# Altium PCB ServoPCB.PcbDoc
Units mil, origin at the board's own origin, x right, y up, seen from the top; angles counter-clockwise.
Board outline 2000 x 2000 mil, 4 copper layers (Top Layer, 3V3 Layer, GND Layer, Bottom Layer), stack 23.756 mil thick; 54 components, 30 nets, 194 pads, 73 vias.
Unrouted connection lines stored in the file: 1.
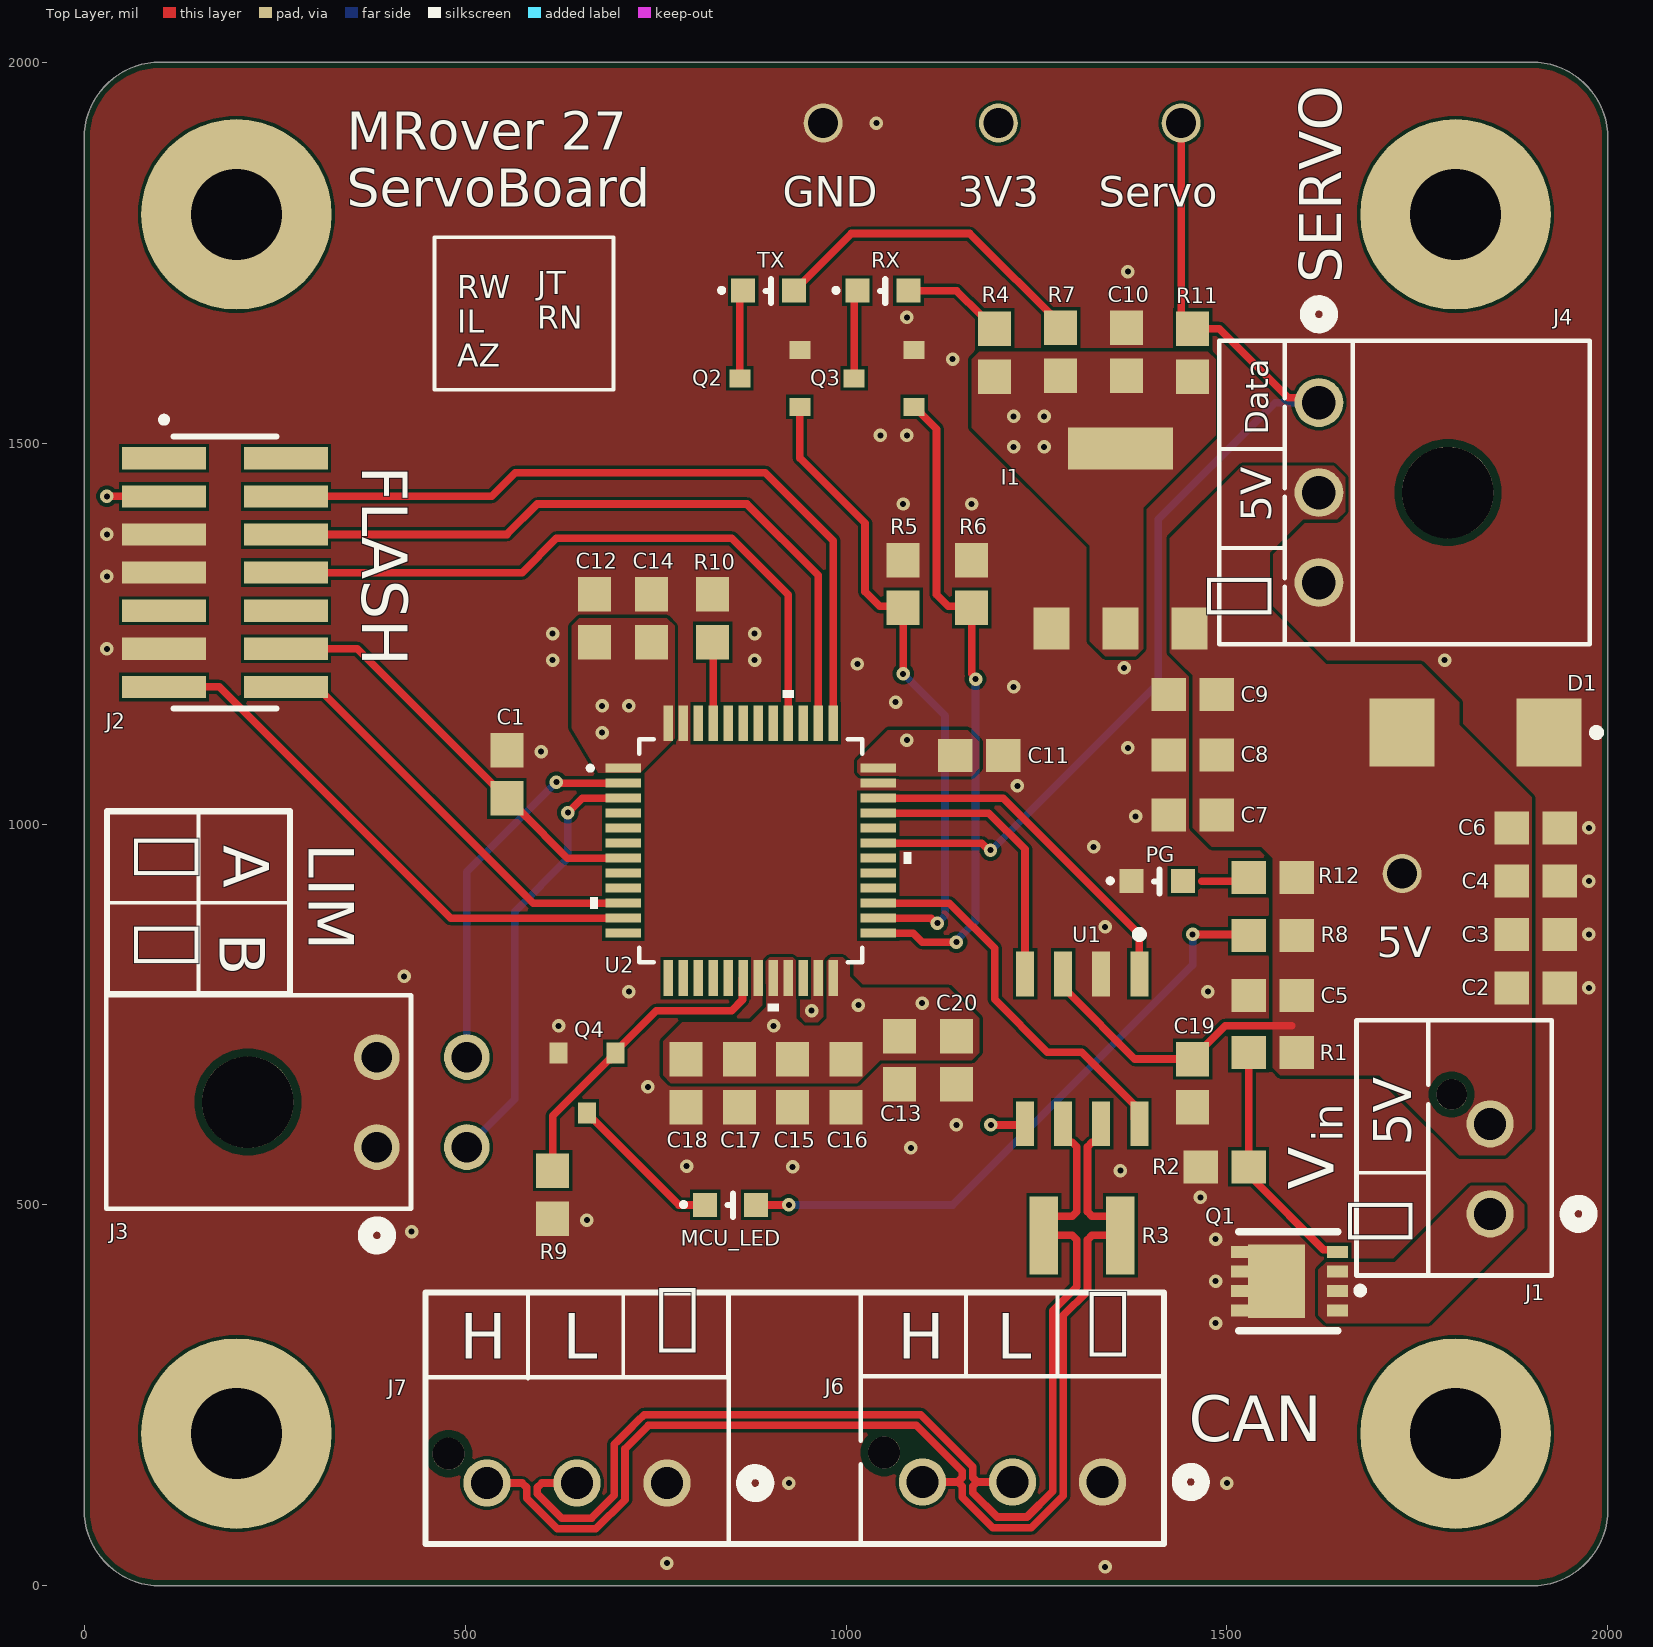
[diagram p0: Top Layer view]
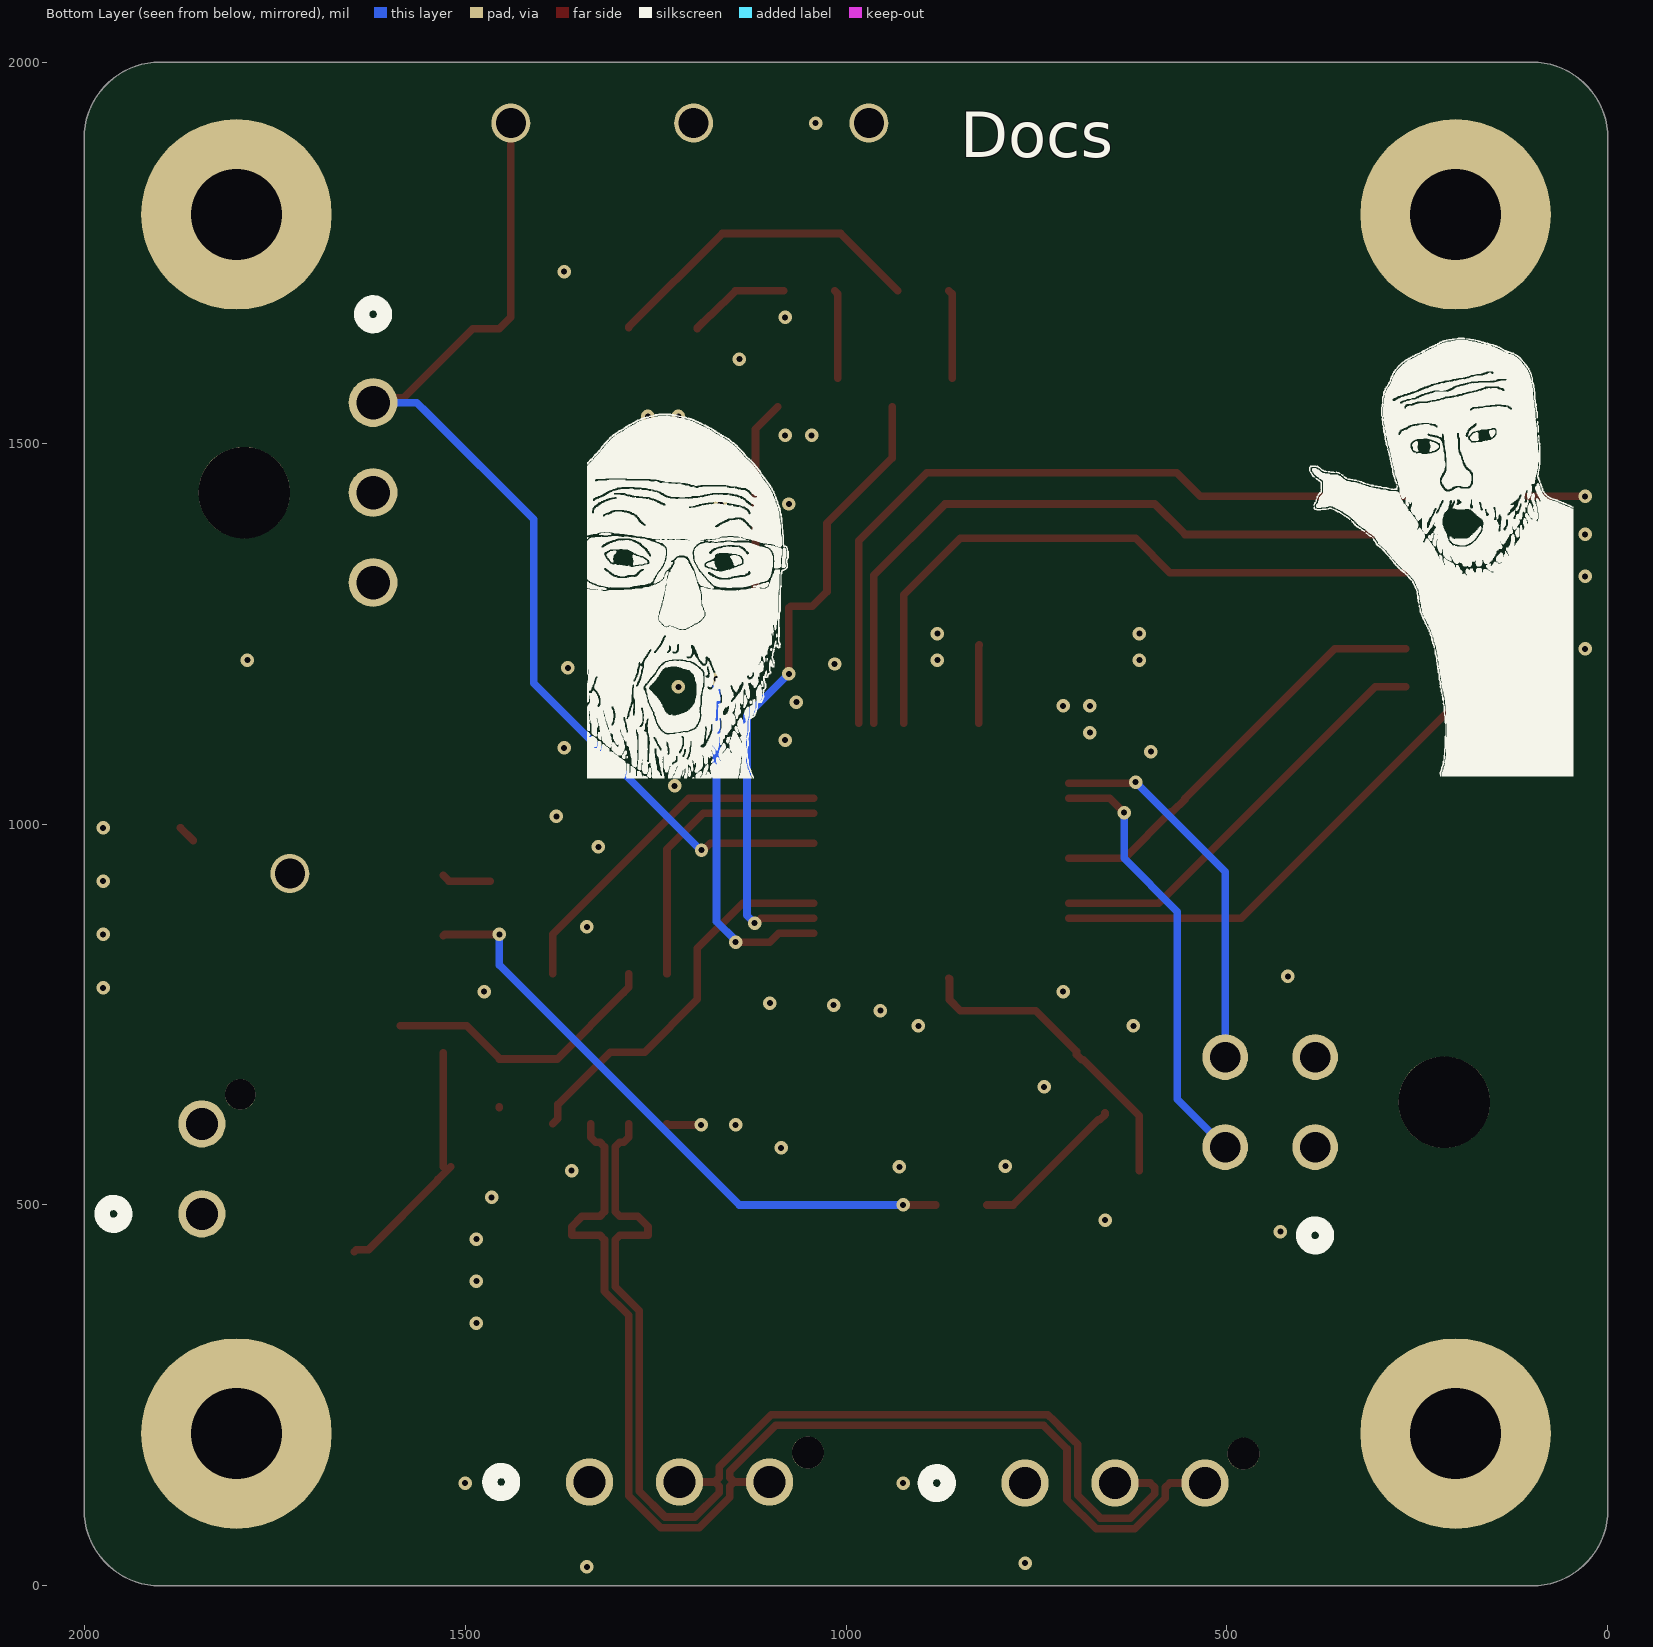
[diagram p1: Bottom Layer view, seen from below]
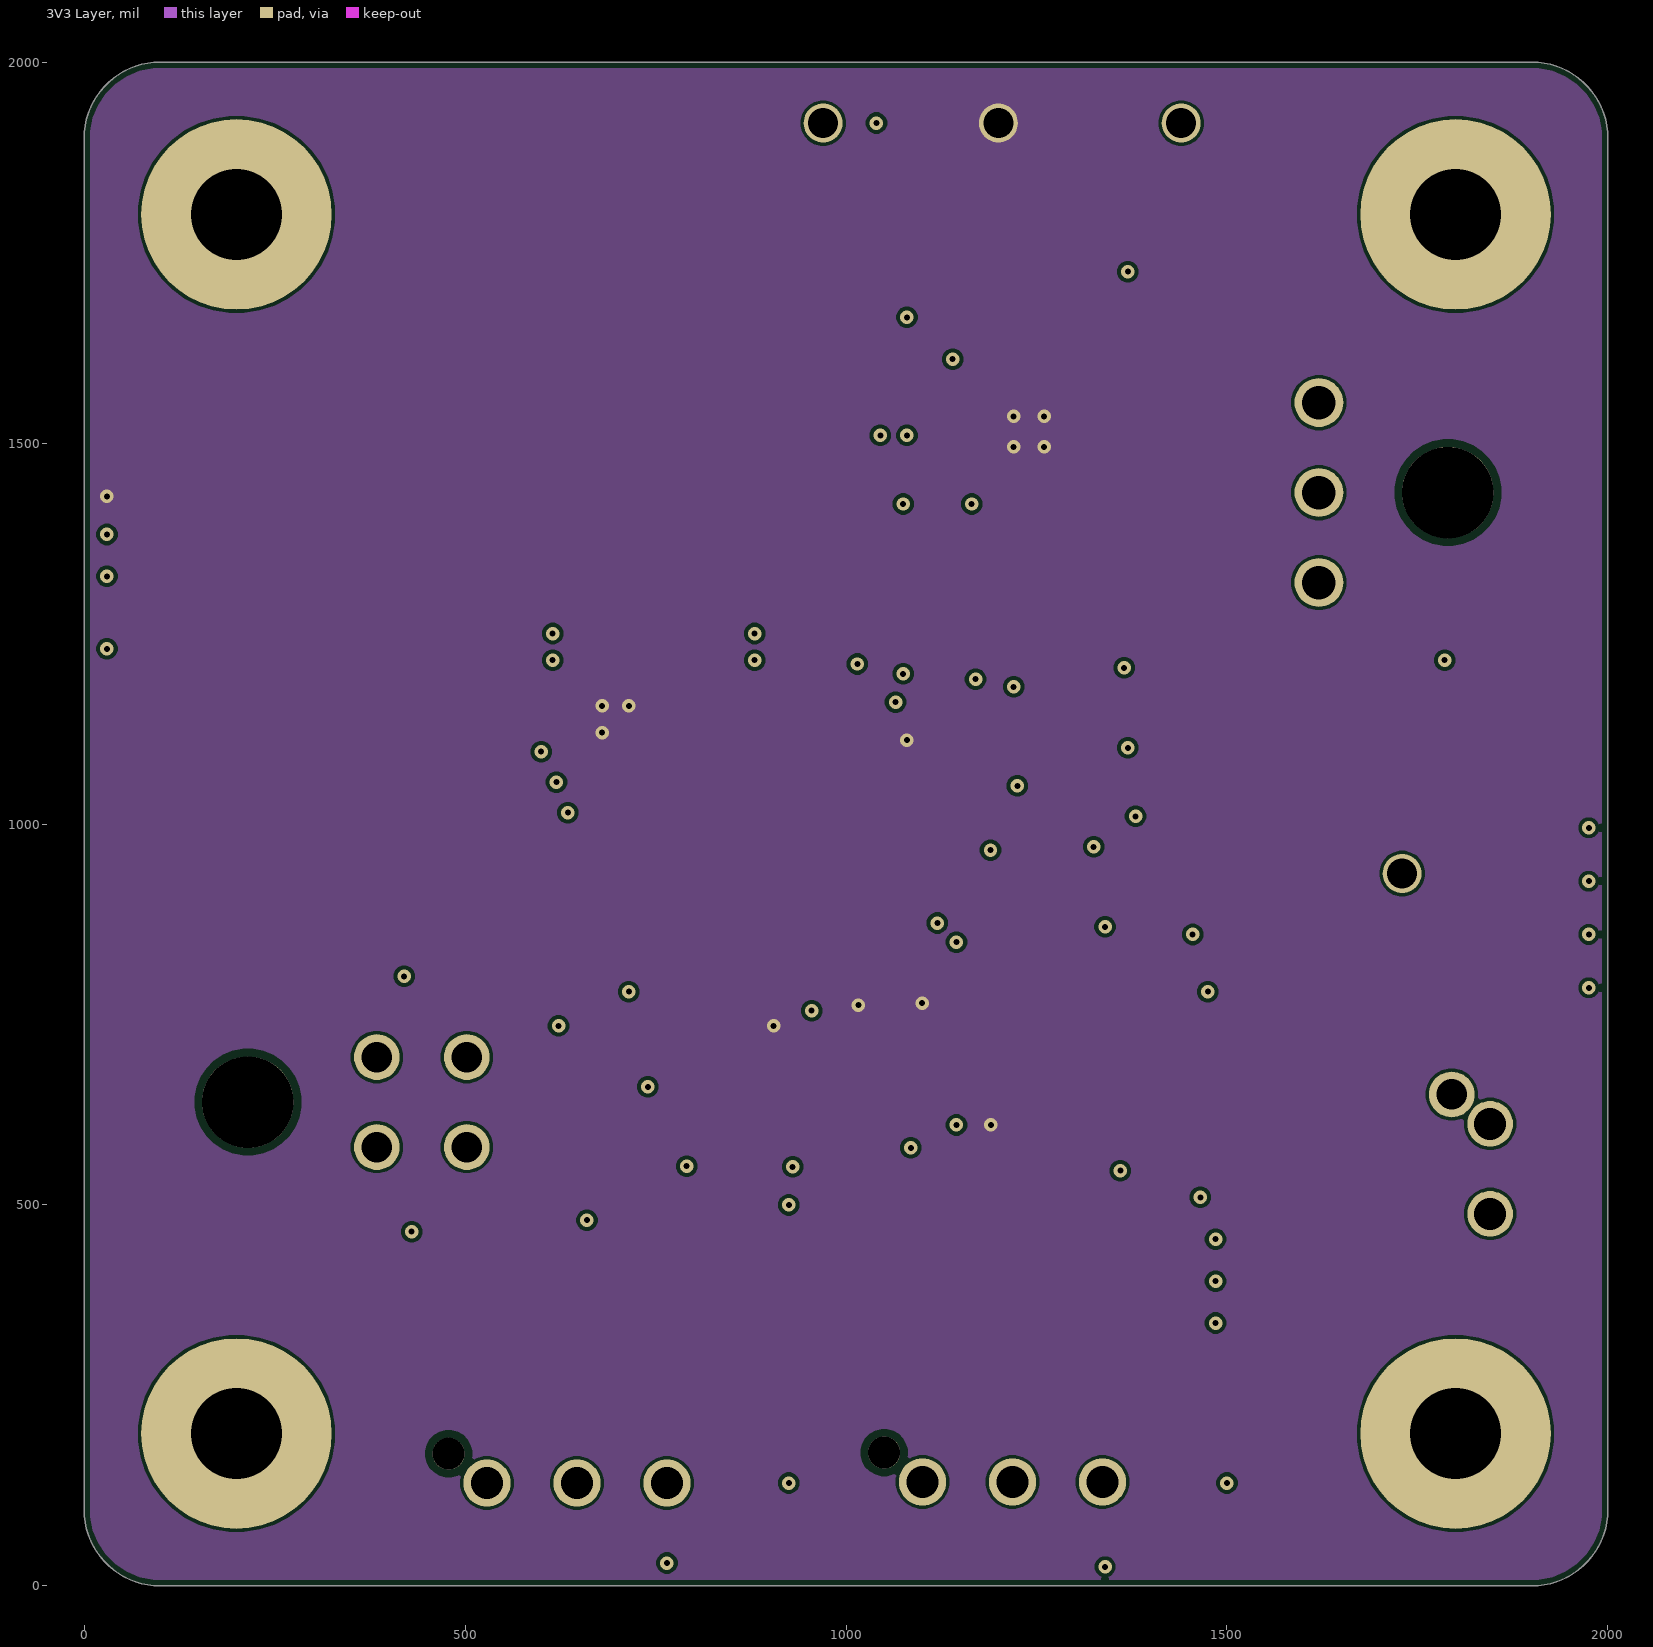
[diagram p2: 3V3 Layer]
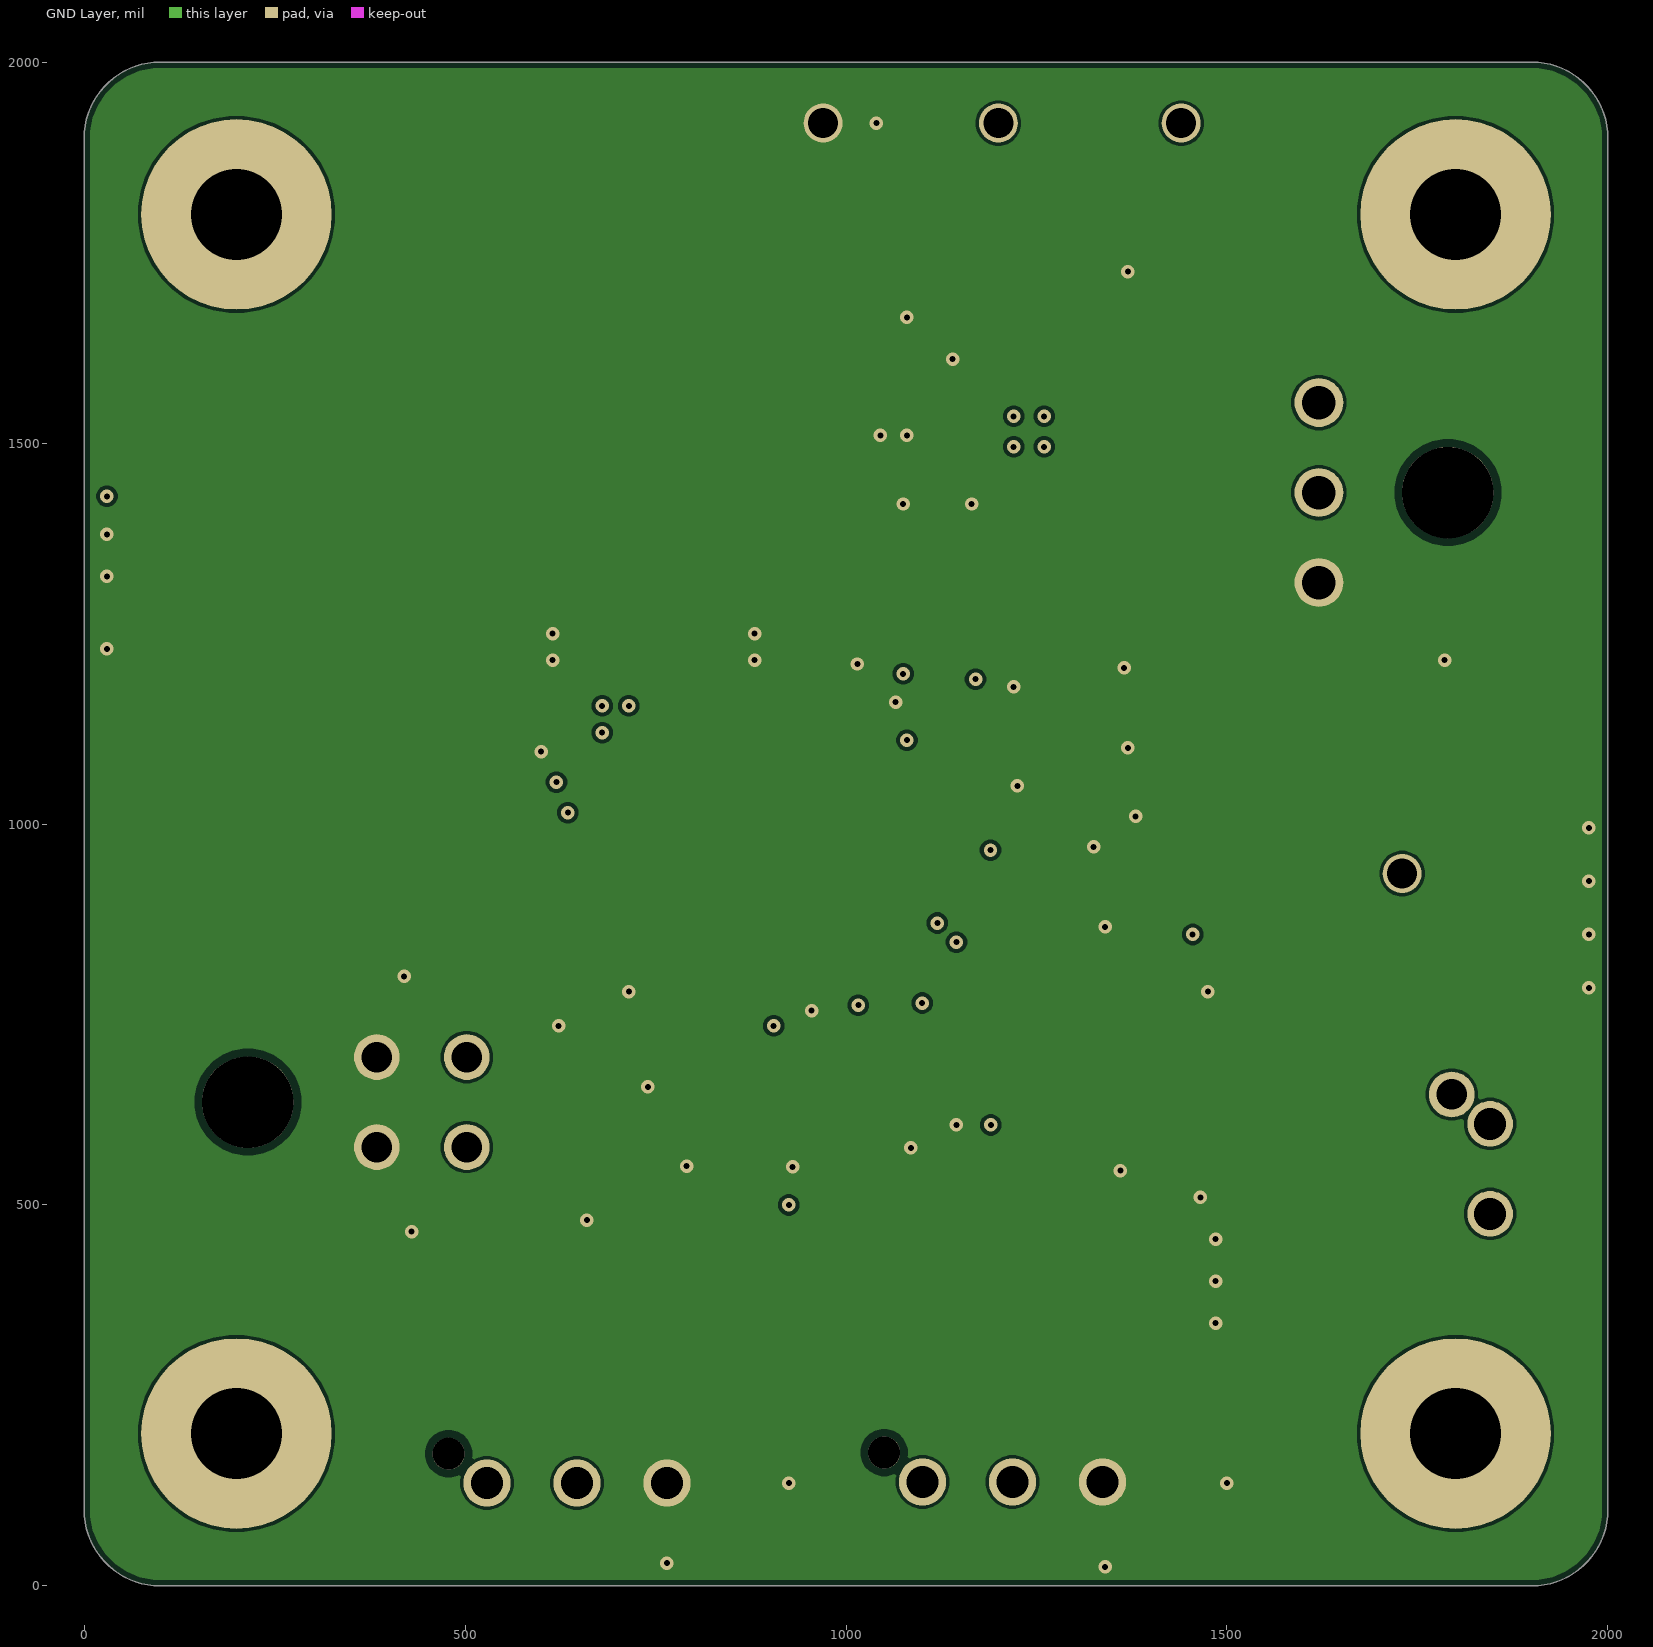
[diagram p3: GND Layer]
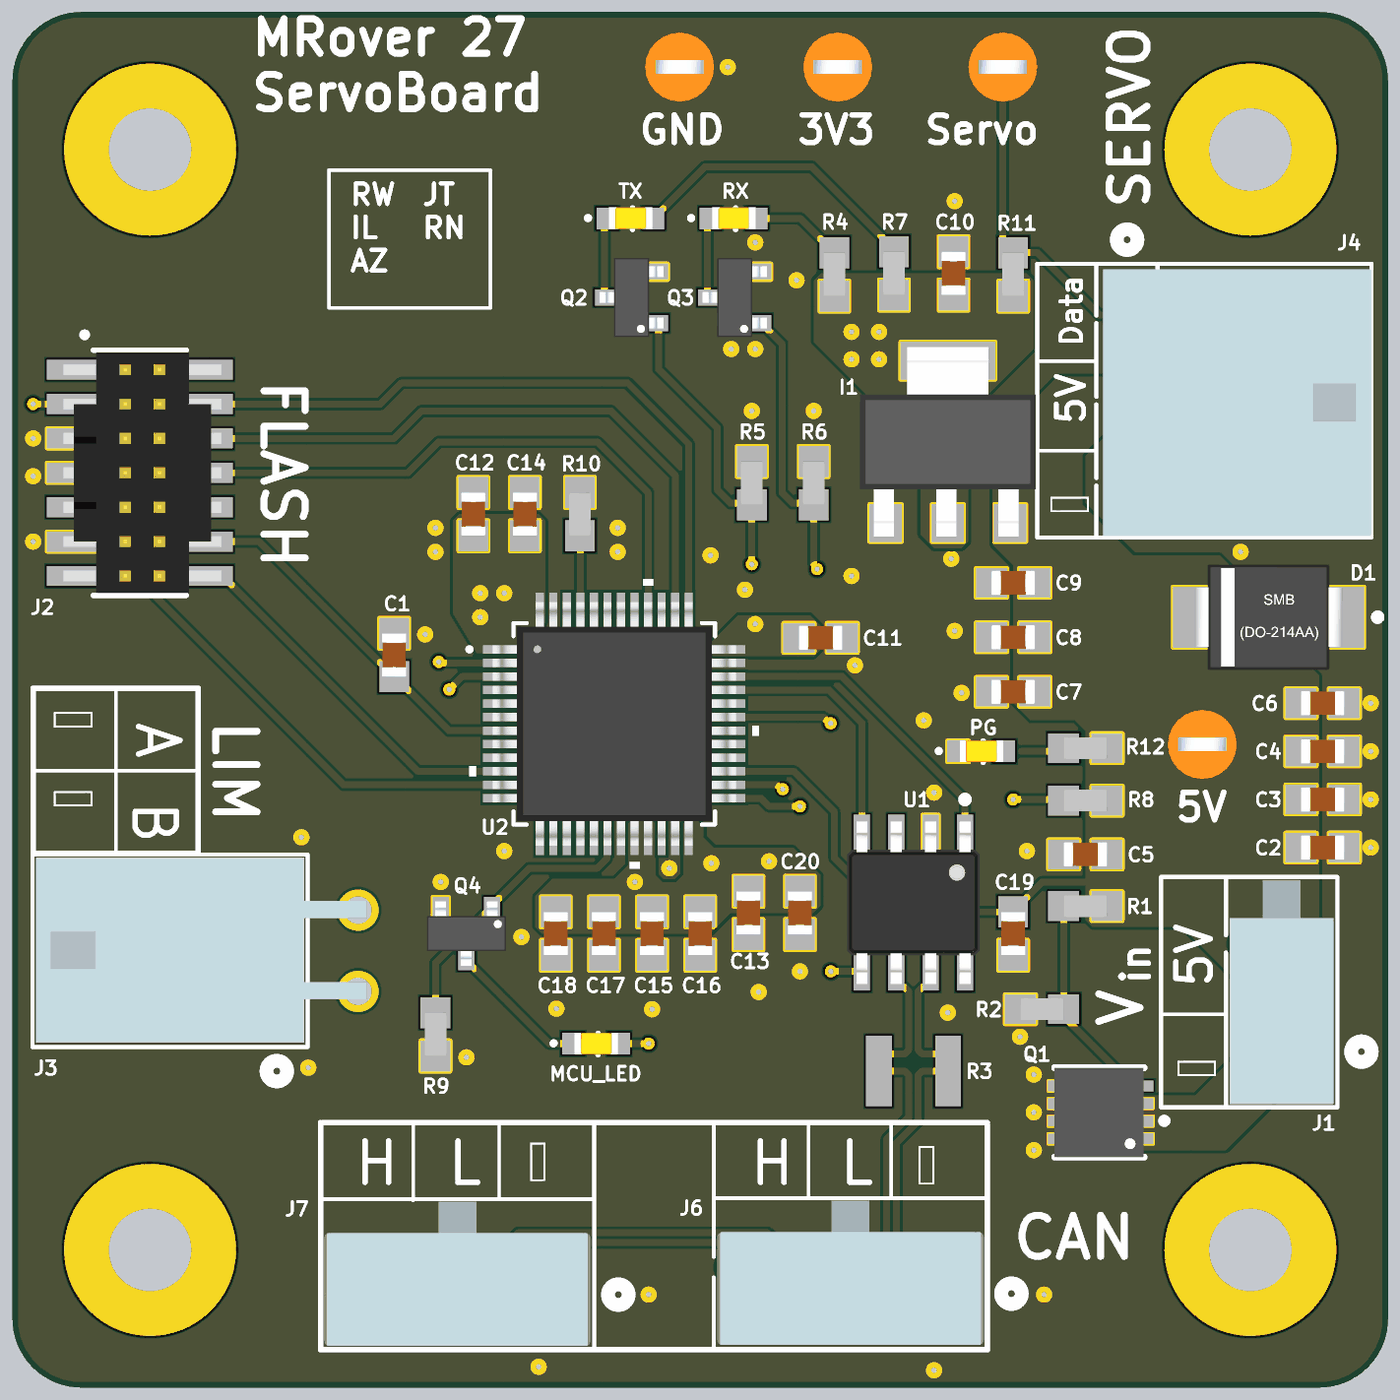
[diagram p4: 3D render of the assembled board from above, using the file's embedded part models]

## Layer stack, top to bottom
Top Solder: solder mask 0.4, Solder Resist, Dk 3.5
Top Layer: signal copper 1.4
Dielectric 1: prepreg 2.8, PP-006, Dk 4.1
3V3 Layer: signal copper 1.378
Dielectric 2: dielectric 12.6, FR-4, Dk 4.8
GND Layer: signal copper 1.378
Dielectric 3: prepreg 2.8, PP-006, Dk 4.1
Bottom Layer: signal copper 1.4
Bottom Solder: solder mask 0.4, Solder Resist, Dk 3.5

## Board outline
0,100 0,1900 cw(c100,1900) 100,2000 1900,2000 cw(c1900,1900) 2000,1900 2000,100 cw(c1900,100) 1900,0 100,0 cw(c100,100)

## Design rules (kind name [scope] priority, off if disabled: settings)
BoardOutlineClearance [All] p1: gap=7.87 ignorepadtopadclearanceinfootprint=FALSE
Clearance "Stitching GND" [IsStitchingVia and InNet('GND') vs (IsVia and (Not IsStitchingVia)) Or IsPad] p1: gap=5 ignorepadtopadclearanceinfootprint=FALSE
Clearance [All] p2: gap=4 ignorepadtopadclearanceinfootprint=FALSE except(2: Arc-THPad Track-THPad THPad-THPad; 5: Arc-Via Track-Via SMDPad-Via THPad-Via Via-Via Via-Fill Via-Poly Via-Region Via-Text; 9.84: Arc-Hole Track-Hole SMDPad-Hole THPad-Hole Via-Hole Fill-Hole Poly-Hole Region-Hole Text-Hole)
ComponentClearance [All] p1: gap=4 collisioncheckmode=3 verticalgap=4 showdistances=TRUE
DiffPairsRouting [All] p1: maxlimit=4 minlimit=4 mostfreqgap=4 toplayer_minwidth=4 toplayer_maxwidth=71497.94 toplayer_prefwidth=4 midlayer1_minwidth=4 midlayer1_maxwidth=71497.94 midlayer1_prefwidth=4 midlayer2_minwidth=4 midlayer2_maxwidth=71497.94 midlayer2_prefwidth=4 bottomlayer_minwidth=4 bottomlayer_maxwidth=71497.94 bottomlayer_prefwidth=4 maxuncoupledlength=500
Height [All] p1: minheight=0 maxheight=71497.94 prefheight=500
HoleSize [All] p1: absolutevalues=TRUE maxlimit=248.03 minlimit=7.87 maxpercent=80.000 minpercent=20.000
HoleToHoleClearance [All] p1: gap=9.84 allowstackedmicrovias=FALSE
MinimumAnnularRing [All] p1: minimumring=3
MinimumSolderMaskSliver [All] p1: minsoldermaskwidth=0
PlaneClearance [All] p1: clearance=4
PlaneConnect PlaneConnectPowerPads [InPadClass('PowerPads')] p1: planeconnectstyle=Direct reliefexpansion=20 reliefentries=4 reliefconductorwidth=10 reliefairgap=10
PlaneConnect [All] p2: pad.planeconnectstyle=Relief pad.reliefexpansion=11.81 pad.reliefentries=4 pad.reliefconductorwidth=4 pad.reliefairgap=4 via.planeconnectstyle=Direct via.reliefexpansion=11.81 via.reliefentries=4 via.reliefconductorwidth=5 via.reliefairgap=5
PolygonConnect PolygonConnect_GND [All] p1: connectstyle=Direct reliefconductorwidth=10 reliefentries=4 polygonreliefangle="90 Angle" airgapwidth=10
PolygonConnect PolygonConnect_3v3 [InNet('VBAT') vs InNet('VBAT')] p2: connectstyle=Direct reliefconductorwidth=10 reliefentries=4 polygonreliefangle="90 Angle" airgapwidth=10
PolygonConnect PolygonConnect_source [InNet('NetJ1_2') vs InNet('NetJ1_2')] p3: connectstyle=Direct reliefconductorwidth=10 reliefentries=4 polygonreliefangle="90 Angle" airgapwidth=10
PolygonConnect PolygonConnect_5V [InNet('+5V') vs InNet('+5V')] p4: connectstyle=Direct reliefconductorwidth=10 reliefentries=4 polygonreliefangle="90 Angle" airgapwidth=10
PolygonConnect PolygonConnectPowerPads [All vs (InPadClass('PowerPads'))] p5: connectstyle=Direct reliefconductorwidth=10 reliefentries=4 polygonreliefangle="90 Angle" airgapwidth=10
PolygonConnect [All] p6: thpad.connectstyle=Relief thpad.reliefconductorwidth=4 thpad.reliefentries=4 thpad.polygonreliefangle="90 Angle" thpad.airgapwidth=4 smdpad.connectstyle=Relief smdpad.reliefconductorwidth=4 smdpad.reliefentries=4 smdpad.polygonreliefangle="90 Angle" smdpad.airgapwidth=4 via.connectstyle=Direct via.reliefconductorwidth=5 via.reliefentries=4 via.polygonreliefangle="90 Angle" via.airgapwidth=5
RoutingVias [All] p1: holewidth=7.87 width=17.72 viastyle="Through Hole" minholewidth=7.87 minwidth=17.72 maxholewidth=248.03 maxwidth=257.87
SilkToSilkClearance [All] p1: silktosilkclearance=0
SilkToSolderMaskClearance [IsPad] p1: minsilkscreentomaskgap=4 clearancetoexposedcopper=TRUE
SolderMaskExpansion [All] p1: expansion=2.95 istentingtop=FALSE
SupplyNets "Schematic Supply Nets_2" [InNet('+5V')] p1: voltage=0.000
SupplyNets "Schematic Supply Nets_1" [InNet('GND')] p2: voltage=0.000
SupplyNets "Schematic Supply Nets" [InNet('VBAT')] p3: voltage=0.000
Width [All] p1: maxlimit=71497.94 minlimit=4 preferedwidth=10 minimp=50.000000 maximp=50.000000 favimp=50.000000
20 further rules are at their usual default settings.

## Classes and differential pairs
component class MCU: C1 C11 C12 C13 C14 C15 C16 C17 C18 J2 MCU_LED PG Q4 R8 R9 R10 R12 U2
component class "Input Power": 3V3 5V C2 C3 C4 C5 C6 C7 C8 C9 C10 D1 GND I1 J1 Q1 R1 R2
component class Headers: J3 J4 J6 J7 R11 Servo Servo_DATA
component class CAN: C19 C20 Q2 Q3 R3 R4 R5 R6 R7 RX TX U1
differential pair CAN: +CAN_H -CAN_L

## Components (designator, comment, footprint, x,y, rotation, side; value= is the part's Value field where it differs from the comment)
3V3 "5003" TEST-POINT-0001 1200,1920 r0 top
5V "5003" TEST-POINT-0001 1730,935 r0 top
C1 "0603B104J500XD" CAP-0603 555,1065 r270 top
C2 "0603W106M250XD" CAP-0603 1905,785 r0 top
C3 "0603B105K500XD" CAP-0603 1905,855 r0 top
C4 "0603B104J500XD" CAP-0603 1905,925 r0 top
C5 "0603B103K101SD" CAP-0603 1560,775 r180 top
C6 "0603N102J500SD" CAP-0603 1905,995 r0 top
C7 "0603N101J101SD" CAP-0603 1455,1011.67 r180 top
C8 "0603N100F500SD" CAP-0603 1455,1090.83 r180 top
C9 "0603W106M250XD" CAP-0603 1455,1170 r180 top
C10 "0603W106M250XD" CAP-0603 1368.33,1620 r90 top
C11 "0603B104J500XD" CAP-0603 1175,1090 r0 top
C12 "0603B104J500XD" CAP-0603 670,1270 r90 top
C13 "0603B104J500XD" CAP-0603 1070,690 r270 top
C14 "0603W475K250XD" CAP-0603 745,1270 r90 top
C15 "0603B103K101SD" CAP-0603 930,660 r270 top
C16 "0603B105K500XD" CAP-0603 1000,660 r270 top
C17 "0603B104J500XD" CAP-0603 860,660 r270 top
C18 "0603B105K500XD" CAP-0603 790,660 r270 top
C19 "0603B105K500XD" CAP-0603 1455,660 r270 top
C20 "0603B105K500XD" CAP-0603 1145,690 r270 top
D1 "SMBJ40CA" "DO-214AA (SMBJ)" 1825,1120 r0 top
GND "5003" TEST-POINT-0001 970,1920 r0 top
I1 "LM1117IMPX-3.3/NOPB" IC-SOT-223-4 1360,1375 r90 top
J1 "2068320201" CONN_2068320000-SD_02_MOL 1845.39,488.31 r0 top
J2 "FTSH-107-01-L-DV-K" SAMTEC_FTSH-107-01-L-DV-K 185,1330 r270 top
J3 "2125280400" CONN_2125280000_04_MOL 384.29,575.94 r270 top
J4 "2157601003" CONN_2157600003-SD_03_PEG_MOL 1620.71,1553.11 r90 top
J6 "2165712003" CONN_2165710003-SD_03_MOL 1336.61,136.42 r0 top
J7 "2165712003" CONN_2165710003-SD_03_MOL 765,135 r0 top
MCU_LED "BL-HKC36G-AV-TRB" LED-0603 791.8,470.42 r0 top
PG "BL-HKC36G-AV-TRB" LED-0603 1351.8,895.42 r0 top
Q1 "CSD18543Q3AT" IC-8VSONCLIP 1679.84,327.68 r90 top
Q2 "T2N7002AK,LM" IC-SOT23-3 900,1585 r90 top
Q3 "T2N7002AK,LM" IC-SOT23-3 1050,1585 r90 top
Q4 "T2N7002AK,LM" IC-SOT23-3 660,660 r180 top
R1 "RMCF0603FT150R" RES-0603 1560,700 r180 top
R2 "RMCF0603FT150R" RES-0603 1497.01,550 r180 top
R3 "RC1210FR-07120RL" RES-1210 1310,460 r180 top
R4 "RMCF0603FT150R" RES-0603 1195,1618.5 r90 top
R5 "CR0603-FX-1002ELF" RES-0603 1075,1315 r270 top
R6 "CR0603-FX-1002ELF" RES-0603 1165,1315 r270 top
R7 "CR0603-FX-68R0ELF" RES-0603 1281.67,1620 r90 top
R8 "CR0603-FX-2000ELF" RES-0603 1560,853.33 r180 top
R9 "CR0603-FX-1002ELF" RES-0603 615,513.5 r270 top
R10 "RC0603JR-070RL" RES-0603 825,1270 r270 top
R11 "CR0603-FX-1002ELF" RES-0603 1455,1618.5 r270 top
R12 "CR0603-FX-2000ELF" RES-0603 1560,929.61 r180 top
RX "BL-HKC36G-AV-TRB" LED-0603 991.8,1670.43 r0 top
Servo "5003" TEST-POINT-0001 1440,1920 r180 top (schematic designator TP4)
TX "BL-HKC36G-AV-TRB" LED-0603 841.8,1670.43 r0 top
U1 "TCAN1044VDRQ1" IC-8SOIC 1310,705 r180 top
U2 "STM32G431CBT6" IC-LQFP48 875,965 r0 top

## Footprints (in the part's own frame and the unit in brackets; to place one, negate y for a bottom-side part, rotate by r counter-clockwise, add the part's x,y. Pads: shape width x height; smd on the part's side, far side on the other; paste and mask are expansions set on the pad)
CAP-0603 [mm]
  rect 1.15x1.1 smd: 1(-0.8,0) 2(0.8,0)
  body extent -0.8,-0.45 0.8,0.45, height 0.8
CONN_2068320000-SD_02_MOL [mil]
  round 62 / inner round 60 / far side round 62 hole 42 paste-99999 mask+0: 1(0,0) 2(0,118.11)
  round 40 / inner round 60 / far side round 40 hole 40 unplated paste-99999 mask+0: 3(-50.39,156.69)
  silkscreen extent -81,-81 131,254, body extent -76,-76 76,249, height 392
CONN_2125280000_04_MOL [mil]
  round 60 hole 40 paste-99999 mask+0: 1(0,0) 2(-118.11,0) 3(0,118.11) 4(-118.11,118.11)
  round 120 hole 120 unplated paste-99999 mask+0: 5(-59.06,-169.29)
  silkscreen extent -199,-355 131,45, body extent -195,-350 75,131, height 325
CONN_2157600003-SD_03_PEG_MOL [mil]
  round 64 hole 44 paste-99999 mask+0: 1(0,0) 2(-118.11,0) 3(-236.22,0)
  round 120 hole 120 unplated paste-99999 mask+0: 4(-118.11,-169.29)
  silkscreen extent -317,-355 131,45, body extent -315,-355 73,35, height 210
CONN_2165710003-SD_03_MOL [mil]
  round 62 hole 42 paste-99999 mask+0: 1(0,0) 2(-118.11,0) 3(-236.22,0)
  round 42 hole 42 unplated paste-99999 mask+0: 4(-286.61,38.58)
  silkscreen extent -317,-81 131,139, body extent -312,-75 76,135, height 394
"DO-214AA (SMBJ)" [mm]
  rect 2.16x2.26 smd: 1(-2.416,0) 2(2.484,0)
  silkscreen extent 3.94,-0.12 4.19,0.12, body extent -2.72,-1.95 2.78,1.95, height 2.45
IC-8SOIC [mm]
  rect 0.6x1.5 smd: 1(-1.905,-2.5) 2(-0.635,-2.5) 3(0.635,-2.5) 4(1.905,-2.5) 5(1.905,2.5) 6(0.635,2.5) 7(-0.635,2.5) 8(-1.905,2.5)
  silkscreen extent -2.03,-3.93 -1.78,-3.69, body extent -2.45,-3 2.45,3, height 1.75
IC-8VSONCLIP [mm]
  rect 0.4x0.7 smd paste-100 mask+0.05: 1(2.812,0.877) 2(0.862,0.877) 2(1.512,0.877) 2(2.162,0.877) 3(0.862,4.077) 3(1.512,4.077) 3(2.162,4.077) 3(2.812,4.077)
  rect 2.45x1.9 smd paste-100 mask+0.05: 3(1.837,2.917)
  silkscreen extent 0.19,0.03 3.49,4.18, body extent 0.18,0.89 3.48,4.19, height 1.1
IC-LQFP48 [mil]
  rect 47x12 smd paste+0 mask+0: 1(-167.32,108.27) 2(-167.32,88.58) 3(-167.32,68.9) 4(-167.32,49.21) 5(-167.32,29.53) 6(-167.32,9.84) 7(-167.32,-9.84) 8(-167.32,-29.53) 9(-167.32,-49.21) 10(-167.32,-68.9) 11(-167.32,-88.58) 12(-167.32,-108.27) 25(167.32,-108.27) 26(167.32,-88.58) 27(167.32,-68.9) 28(167.32,-49.21) 29(167.32,-29.53) 30(167.32,-9.84) 31(167.32,9.84) 32(167.32,29.53) 33(167.32,49.21) 34(167.32,68.9) 35(167.32,88.58) 36(167.32,108.27)
  rect 12x47 smd paste+0 mask+0: 13(-108.27,-167.32) 14(-88.58,-167.32) 15(-68.9,-167.32) 16(-49.21,-167.32) 17(-29.53,-167.32) 18(-9.84,-167.32) 19(9.84,-167.32) 20(29.53,-167.32) 21(49.21,-167.32) 22(68.9,-167.32) 23(88.58,-167.32) 24(108.27,-167.32) 37(108.27,167.32) 38(88.58,167.32) 39(68.9,167.32) 40(49.21,167.32) 41(29.53,167.32) 42(9.84,167.32) 43(-9.84,167.32) 44(-29.53,167.32) 45(-49.21,167.32) 46(-68.9,167.32) 47(-88.58,167.32) 48(-108.27,167.32)
  silkscreen extent -214,-211 211,211, body extent -177,-177 177,177, height 63
IC-SOT23-3 [mm]
  rect 0.6x0.7 smd: 1(-0.95,-1) 2(0.95,-1) 3(0,1)
  body extent -1.46,-1.18 1.46,1.19, height 1.12
IC-SOT-223-4 [mm]
  rect 1.4x1.2 smd mask+0.07: 1(-3,2.3) 3(-3,-2.3) 4(-3,0)
  rect 1.4x3.5 smd: 2(3,0)
  body extent -3.5,-3.25 3.5,3.25, height 1.68
LED-0603 [mm]
  rect 0.8x0.8 smd: 1(2.291,0.751) 2(0.589,0.751)
  silkscreen extent -0.2,0.34 1.52,1.13, body extent 0.65,0.36 2.25,1.16, height 0.39
RES-0603 [mm]
  rect 1.15x1.1 smd: 1(-0.8,0) 2(0.8,0)
  body extent -0.8,-0.4 0.8,0.4, height 0.43
RES-1210 [mm] "Chip Resistor, 2-Leads, Body 3.10x2.60mm, IPC High Density"
  rect 0.95x2.6 smd: 1(-1.275,0) 2(1.275,0)
  body extent -1.6,-1.35 1.6,1.35, height 0.6
SAMTEC_FTSH-107-01-L-DV-K [mm]
  rect 0.74x2.79 smd: 01(-3.81,-2.035) 02(-3.81,2.035) 03(-2.54,-2.035) 04(-2.54,2.035) 05(-1.27,-2.035) 06(-1.27,2.035) 07(0,-2.035) 08(0,2.035) 09(1.27,-2.035) 10(1.27,2.035) 11(2.54,-2.035) 12(2.54,2.035) 13(3.81,-2.035) 14(3.81,2.035)
  silkscreen extent -5.19,-2.13 4.53,1.72, body extent -4.45,-2.82 4.45,3.02, height 5.96
TEST-POINT-0001 [mm] "2024 miniature test point"
  round 1.3 hole 1: 1(0,0)
  body extent -1.27,-1.27 1.27,1.27, height 4.57

## Part data
3V3 5V GND Servo: library part TEST-POINT-0001, "Oranange PC Test Point, Miniature Phoisphor Bronze Silver Plating Through Hole Mounting Type"
C1 C4 C11 C12 C13 C17: library part "CAP 0603", "CAP CER 0.1UF 50V X7R 0603", Capacitance=100nF, Voltage Rating=50V
C2 C9 C10: library part "CAP 0603", "CAP.,SMD,0603,X5R,10UF,20%,25V", Capacitance=10uF, Voltage Rating=25V
C3 C16 C18 C19 C20: library part "CAP 0603", "CAP. SMD,0603,X7R,1UF,10%,50V", Capacitance=1uF, Voltage Rating=50V
C5 C15: library part "CAP 0603", "Cap.,SMD,0603,X7R,10nF,10%,100V", Capacitance=10nF, Voltage Rating=100V
C6: library part "CAP 0603", "CAP,SMD,0603,NP0,1NF,5%,50V", Capacitance=1nF, Voltage Rating=50V
C7: library part "CAP 0603", "Cap.,SMD,0603,NP0,100pF,5%,100V", Capacitance=100pF, Voltage Rating=100V
C8: library part "CAP 0603", "Cap.,SMD,0603,NP0,10pF,1%,50V", Capacitance=10pF, Voltage Rating=50V
C14: library part "CAP 0603", "CAP. SMD,0603,X5R,4.7UF,10%,25V", Capacitance=4.7uF, Voltage Rating=25V
D1: library part DIO-TVS-0001, "TVS DIODE 40VWM 64.5VC DO214AA", Current Rating=9.3A, Voltage Rating=64.5V, ComponentLink1Description=Datasheet, ComponentLink1URL=https://www.littelfuse.com/media?resourcetype=datasheets&itemid=09a6ae9a-73cb-4ac4-acac-e6dab92ab953&filename=littelfuse_tvs_diode_smbj_datasheet.pdf
I1: library part IC_LDO_3V3_0001, "IC REG LIN 3.3V 800MA SOT223-4", ComponentLink1Description="New link", ComponentLink1URL=https://www.ti.com/lit/ds/symlink/lm1117.pdf?HQS=dis-dk-null-digikeymode-dsf-pf-null-wwe&ts=1721700739746
J1: library part "CONN MF+ 2 PIN VERT", "Micro-Fit+ Vertical Header, Through Hole, 3.00mm Pitch, Dual Row, 2 Circuits, Tin (Sn) Plating, Glow-Wire Capable, Black, Tray", Manufacturer_Name="Molex Connector Corporation", Copyright="Copyright (C) 2025 Ultra Librarian. All rights reserved.", Manufacturer_Part_Number=2068320201, RefDes=RefDes, Type=Type
J2: library part CONN_Flashing-0001, "Connector Header Surface Mount 14 position 0.050\" (1.27mm)", Package=None, Availability=Unavailable, ComponentLink1Description=Datasheet, ComponentLink1URL=https://mm.digikey.com/Volume0/opasdata/d220001/medias/docus/6209/ftsh-1xx-xx-xxx-dv-xxx-xxx-x-xx-mkt.pdf, MF=Samtec, MP=FTSH-107-01-L-DV-K, Price=None
J3: library part "CONN MF+ 4 PIN Right Angle Square", "Micro-Fit+ Right-Angle Header, Through Hole, 3.00mm Pitch, Dual Row, 4 Circuits, 1.52Âµm Matte Tin (Sn) Plating, Glow-Wire Capable, Black", Manufacturer_Name="Molex Connector Corporation", Copyright="Copyright (C) 2026 Ultra Librarian. All rights reserved.", Manufacturer_Part_Number=2125280400, RefDes=RefDes, Type=Type
J4: library part "CONN MF+ 3 PIN Right Angle", "Micro-Fit+ Right-Angle Header, Through Hole, 3.00mm Pitch, Single Row, 3  Circuits, Matte Tin (Sn) Plating, Glow-Wire Capable, Black", Manufacturer_Name=Molex, Copyright="Copyright (C) 2026 Ultra Librarian. All rights reserved.", Datasheet=https://www.molex.com/en-us/products/part-detail-pdf/2157601003?display=pdf, Manufacturer_Part_Number=2157601003, RefDes=RefDes, Type=Type
J6 J7: library part "CONN MF+ 3 PIN VERT", "Micro-Fit+ Vertical Header, Through Hole, 3.00mm Pitch, Single Row, 3 Circuits, 0.38Âµm Gold (Au) Plating, Glow-Wire Capable, Black", Manufacturer_Name="Molex Connector Corporation", Copyright="Copyright (C) 2026 Ultra Librarian. All rights reserved.", Manufacturer_Part_Number=2165712003, RefDes=RefDes, Type=Type
MCU_LED PG RX TX: library part LED-0001, "LED YELLOW CLEAR 0603 SMD", Forward Current=30mA, Forward Voltage=2V, ComponentLink1Description=Datasheet, ComponentLink1URL=https://www.americanbrightled.com/pdffiles/led-components/smt/BL-HKC36G-AV-TRB.pdf
Q1: library part NMOS-60A-0001, "MOSFET N-CH 60V 12A/60A 8VSON", Continuous Current=60A, Voltage=60V, ComponentLink2Description=Datasheet, ComponentLink2URL=http://www.ti.com/lit/ds/symlink/csd18543q3a.pdf
Q2 Q3 Q4: library part NMOS-200MA-0001, "MOSFET N-CH 60V 200MA SOT23", Continuous Current=200mA, Voltage=60V, ComponentLink1Description=Datasheet, ComponentLink1URL=https://toshiba.semicon-storage.com/info/T2N7002AK_datasheet_en_20150401.pdf?did=29712&prodName=T2N7002AK
R1 R2: library part "RES 0603", "RES 150K OHM 1% 1/10W 0603", Resistance=150kΩ, Wattage=1/10W
R3: library part "RES CAN TERM 1210", Resistance=120Ω, Wattage="1/2 W"
R4 R7: library part "RES 0603", "RES 150 OHM 1% 1/10W 0603", Resistance=150Ω, Wattage=1/10W
R5 R6 R9: library part "RES 0603", "RES SMD 10K OHM 1% 1/10W 0603", Resistance=10kΩ, Wattage=1/10W
R8 R12: library part "RES 0603", "RES SMD 200 OHM 1% 1/10W 0603", Resistance=200Ω, Wattage=1/10W
R10: library part "RES 0603", "RES 0 OHM JUMPER 1/10W 0603", Resistance=0Ω, Wattage=1/16W
R11: library part "RES 0603", "RES 4.7K OHM 1% 1/10W 0603", Resistance=4.7kΩ, Wattage=1/10W
U1: library part IC-CAN-0001, "IC TRANSCEIVER 1/1 8SOIC", ComponentLink1Description=Datasheet, ComponentLink1URL=https://www.ti.com/lit/ds/symlink/tcan1044-q1.pdf?HQS=dis-dk-null-digikeymode-dsf-pf-null-wwe&ts=1728758303289&ref_url=https%253A%252F%252Fwww.ti.com%252Fgeneral%252Fdocs%252Fsuppproductinfo.tsp%253FdistId%253D10%2526gotoUrl%253Dhttps%253A%252F%252Fwww.ti.com%252Flit%252Fgpn%252Ftcan1044-q1
U2: library part IC-STM32G431CBT6, "IC MCU 32BIT 128KB FLASH 48LQFP", Package=48LQFP, ComponentLink1Description=Datasheet, ComponentLink1URL=https://www.st.com/resource/en/datasheet/stm32g431cb.pdf

## Free pads (board coordinates)
  round 250 hole 120: ""(200,200) ""(200,1800) ""(1800,200) ""(1800,1800)

## Via types
v1: diameter 17.72, hole 7.87, Top Layer to Bottom Layer, 73 vias

## Nets (pads, with @x,y where several pads share a name; then routed paths per layer and width w, separated by ;. In a path a pad name is that pad's centre, name@x,y a point inside that pad or via, vN(x,y) a via of type N, cw(c..) or ccw(c..) an arc to the next point about the centre after c; other vN are vias at no path point)
+5V: 5V.1 C2.1 C3.1 C4.1 C5.1 C6.1 C7.1 C8.1 C9.1 C19.1 D1.1 I1.3 J1.2 J4.2 R1.1 R8.1 R12.1 U1.3 | length 397.9
  Top Layer w10: U1.3 1285,785.71 1291.81,778.9 1379.21,691.5 C19.1 ; C19.1@1455,692.48 1497.52,735 1585,735 ; C6.1@1856.85,978.35 C6.1
CAN_H: J6.3 J7.3 R3.1 U1.7 | length 1612.5
  Top Layer w10: J7.3 574.98,135 580.83,129.14 580.83,115.06 620.89,75 671.74,75 710,113.26 710,180 740.84,210.84 1092.17,210.84 1152.45,150.56 1152.45,142.28 1146.59,136.42 ; J6.3 1146.59,136.42 ; U1.7 1335,588.86 1328.19,582.05 1322.86,582.05 1317,576.19 1317,491.05 1322.86,485.2 1346.5,485.2 1360.2,471.5 R3.1 1322.86,460 1317,454.14 1317,387 1285.13,355.13 1285.13,118.19 1243.36,76.42 1192.51,76.42 1152.45,116.48 1152.45,130.56 1146.59,136.42
CAN_L: J6.2 J7.2 R3.2 U1.6 | length 1566.1
  Top Layer w10: J7.2 600.69,135 594.83,129.14 594.83,120.86 626.69,89 665.94,89 696,119.06 696,185.8 700.1,189.9 713.2,203 726.84,216.64 735.04,224.84 1097.96,224.84 1166.45,156.36 1166.45,142.28 1172.31,136.42 ; J6.2 1172.31,136.42 ; U1.6 1285,588.86 1291.81,582.05 1297.14,582.05 1303,576.19 1303,491.05 1297.14,485.2 1273.5,485.2 1259.8,471.5 R3.2 1297.14,460 1303,454.14 1303,392.8 1279.33,369.13 1271.13,360.93 1271.13,123.99 1237.56,90.42 1198.31,90.42 1166.45,122.28 1166.45,130.56 1172.31,136.42
DEBUG: Q4.1 R9.1 U2.18 | length 413.4
  Top Layer w10: R9.1 615,616.97 688.62,690.59 690.59,690.59 697.4,697.4 Q4.1 ; Q4.1@697.4,701.34 751.06,755 850,755 864.16,769.16 864.16,796.68 U2.18
GND: C1.1 C2.2 C3.2 C4.2 C5.2 C6.2 C7.2 C8.2 C9.2 C10.2 C11.2 C12.2 C13.2 C14.2 C15.2 C16.2 C17.2 C18.2 C19.2 C20.2 D1.2 GND.1 I1.1 J2.05 J2.07 J2.11 J3.1 J3.2 J4.3 J6.1 J7.1 PG.2 Q1.3 Q2.2 Q3.2 Q4.2 R2.2 R5.1 R6.1 R9.2 R10.1 U1.2 U2.19 U2.23 U2.35 U2.47 | length 1
  Top Layer w10: C19.2@1455,627.52 C19.2
  other v1: 1340,25 765,30 925,135 1500,135 1485,345 1485,400 1485,455 430,465 660,480 1465,510 1360,545 930,550 790.83,550.83 1085,575 1145,605 740,655 622.66,735 955,755 715,780 1475,780 1975,785 420,800 1975,855 1340,865 1975,925 1325,970 1975,995 1380,1010 1225,1050 600,1095 1370,1100 1065,1160 1220,1180 1365,1205 1015,1210 615,1215 880,1215 1785.67,1215 30,1230 615,1250 880,1250 30,1325 30,1380 1075,1420 1165,1420 1045,1510 1080,1510 1140,1610 1080,1665 1370,1725 1040,1920
NetJ1_1: J1.1 Q1.2
NetJ3_3: J3.3 U2.3 | length 574.5
  Top Layer w10: v1(635,1015) 653.9,1033.9 U2.3
  Bottom Layer w10: J3.3 565,638.54 565,885 635,955 v1(635,1015)
NetJ3_4: J3.4 U2.2 | length 497.9
  Top Layer w10: v1(620,1055) 625,1055 626.42,1053.58 U2.2
  Bottom Layer w10: J3.4 502.4,937.4 v1(620,1055)
NetJ4_1: J4.1 R11.1 Servo.1 U2.31 | length 1413.5
  Top Layer w10: U2.31 1042.4,974.92 1178.39,974.92 1187.57,965.74 v1(1189.66,965.74) ; Servo.1 1440,1665 R11.1 1490,1650 1580.57,1559.43 1614.38,1559.43 J4.1
  Bottom Layer w10: v1(1189.66,965.74) 1190.74,965.74 1410,1185 1410,1400 1548.78,1538.78 1549.1,1538.78 1563.42,1553.11 J4.1@1600.71,1553.11
NetMCU_LED_1: MCU_LED.1 R8.2 | length 817.7
  Top Layer w10: MCU_LED.1 v1(925,500) ; v1(1455,855) 1526.84,855 R8.2
  Bottom Layer w10: v1(925,500) 1140,500 1455,815 v1(1455,855)
NetMCU_LED_2: MCU_LED.2 Q4.3 | length 206.1
  Top Layer w10: Q4.3 660,618.66 666.81,611.85 668.78,611.85 780.63,500 MCU_LED.2
NetPG_1: PG.1 R12.2 | length 64.6
  Top Layer w10: 1467,925 1521,925 R12.2@1528.5,932.5
NetQ1_1: Q1.1 R1.2 R2.1 | length 323.1
  Top Layer w10: R2.1@1518.98,550 1535.63,533.35 1535.63,532.36 1626.73,441.26 1642.44,441.26 Q1.1 ; R2.1 R1.2
NetQ2_1: Q2.1 R5.2 U2.26 | length 857.7
  Top Layer w10: Q2.1 939.37,1480.45 1025,1394.82 1025,1305 1044.2,1285.8 1072.71,1285.8 R5.2 v1(1075,1197.09) ; U2.26 1111.49,876.42 1117.91,870 v1(1120,870)
  Bottom Layer w10: v1(1075,1197.09) 1130,1142.09 1130,880 v1(1120,870)
NetQ2_3: Q2.3 TX.2 | length 116.8
  Top Layer w10: Q2.3 860.63,1695.63 TX.2
NetQ3_1: Q3.1 R6.2 U2.25 | length 870.6
  Top Layer w10: U2.25 1088.27,856.73 1100,845 v1(1145,845) ; Q3.1 1118.86,1518.11 1118.86,1301.14 1134.2,1285.8 1162.71,1285.8 R6.2 1165,1197.09 1170,1192.09 v1(1170,1190)
  Bottom Layer w10: v1(1145,845) 1145,847.09 1170,872.09 v1(1170,1190)
NetQ3_3: Q3.3 RX.2 | length 116.8
  Top Layer w10: Q3.3 1010.63,1695.63 RX.2
NetR4_2: R4.2 RX.1 | length 134.3
  Top Layer w10: RX.1 1145,1700 1177.36,1667.64 1178.35,1667.64 1195,1650.98 R4.2
NetR7_2: R7.2 TX.1 | length 435.8
  Top Layer w10: TX.1 1007,1775 1162.48,1775 1285,1652.48 R7.2@1285,1651.5
NetR10_2: R10.2 U2.45 | length 103
  Top Layer w10: R10.2@825,1235 825.79,1234.21 U2.45
NetU1_1: U1.1 U2.34 | length 468.4
  Top Layer w10: U2.34 1206.1,1033.9 1385,855 U1.1
NetU1_4: U1.4 U2.33 | length 375.6
  Top Layer w10: U2.33 1187.46,1014.21 1235,966.67 U1.4
NetU1_8: U1.8 U2.27 | length 512.5
  Top Layer w10: U2.27 1135.57,896.1 1195,836.67 1195,770 1264.36,700.64 1309.36,700.64 1378.19,631.81 1378.19,613.39 U1.8
NRST: C1.2 J2.12 U2.7 | length 556.9
  Top Layer w10: J2.12 358.5,1230 C1.2 ; C1.2@555,1033.45 555,1032.52 571.65,1015.87 573.57,1015.87 634.28,955.16 U2.7
SYS_JTCK_SWCLK: J2.06 U2.38 | length 947.9
  Top Layer w10: J2.06 555,1380 595,1420 870,1420 963.58,1326.42 U2.38
SYS_JTDO_SWO: J2.08 U2.40 | length 876.9
  Top Layer w10: J2.08 575,1330 620,1375 850,1375 924.21,1300.79 U2.40
SYS_JTMS_SWDIO: J2.04 U2.37 | length 1007.3
  Top Layer w10: J2.04 535,1430 565.86,1460.86 894.14,1460.86 983.27,1371.73 U2.37
VBAT: 3V3.1 C10.1 C11.1 C12.1 C13.1 C14.1 C15.1 C16.1 C17.1 C18.1 C20.1 I1.2 I1.4 J2.03 R4.1 R7.1 R11.2 U1.5 U2.1 U2.20 U2.21 U2.24 U2.36 U2.48 | length 120.5
  Top Layer w10: v1(30,1430) J2.03 ; v1(1190,605) 1233.43,605 U1.5
  other v1: 905,735 1016.14,762.24 1100,765 1080,1110 680,1120 680,1155 715,1155 1220,1495 1260,1495 1220,1535 1260,1535
VCP_RX: J2.13 U2.11 | length 728.5
  Top Layer w10: J2.13 177.4,1180 480.98,876.42 U2.11
VCP_TX: J2.14 U2.10 | length 560.2
  Top Layer w10: J2.14 305.47,1180 589.37,896.1 U2.10
pads on no net: J1.3 J2.01 J2.02 J2.09 J2.10 J3.5 J4.4 J6.4 J7.4 U2.4 U2.5 U2.6 U2.8 U2.9 U2.12 U2.13 U2.14 U2.15 U2.16 U2.17 U2.22 U2.28 U2.29 U2.30 U2.32 U2.39 U2.41 U2.42 U2.43 U2.44 U2.46

## Polygon pours and split planes (outlines as drawn)
GND on Top Layer "GND_L01_P023" (solid, pour order 23): 0.71,99.29 ccw(c100.71,99.29) 100.71,-0.71 1900.71,-0.71 ccw(c1900.71,99.29) 2000.71,99.29 2000.71,1899.29 ccw(c1900.71,1899.29) 1900.71,1999.29 100.71,1999.29 ccw(c100.71,1899.29) 0.71,1899.29
+5V on Top Layer "Top Layer-+5V" (solid, remove dead copper, pour order 21): 1615,1470 1640,1470 1655,1455 1655,1410 1645,1400 1600,1400 1555.94,1355.94 1555.94,1284.05 1630,1210 1755,1210 1805,1160 1805,1130 1900,1035 1900,600 1865,565 1805,565 1740,630 1700,670 1570,670 1560,680 1560,955 1545,970 1480,970 1455,995 1455,1195 1440,1210 1425,1225 1425,1375 1520,1470
VBAT on Top Layer "VBAT_L01_P017" (solid, pour order 17): 1015,1083 1055,1123 1160,1123 1175,1108 1175,1073 1165,1063 1020,1063 1015,1068
VBAT on Top Layer "VBAT_L01_P018" (solid, pour order 18): 675,1067.5 730,1067.5 775,1112.5 775,1260 765,1270 650,1270 640,1260 640,1125.83
NetJ1_1 on Top Layer "NETJ1_1_L01_P013" (solid, pour order 19): 1630,425 1620,415 1620,355 1630,345 1765,345 1890,470 1890,500 1865,525 1820,525 1720,425 1687.5,425
VBAT on Top Layer "VBAT_L01_P015" (solid, pour order 15): 1475,1620 1485,1610 1485,1510 1390,1415 1390,1230 1380,1220 1340,1220 1320,1240 1320,1365 1165,1520 1165,1610 1175,1620
VBAT on Top Layer "VBAT_L01_P016" (solid, pour order 16): 995.87,825 1005,815.87 1005,800 1020,785 1135,785 1175,745 1175,700 1165,690 1045,690 1015,660 770,660 760,670 760,715 785,740 875,740 895,760 895,820 900,825 930,825 935,820 935,745 945,735 965,735 975,745 975,820 980,825
GND on GND Layer "GND_L03_P022" (solid, pour order 22): 0.71,99.29 ccw(c100.71,99.29) 100.71,-0.71 1900.71,-0.71 ccw(c1900.71,99.29) 2000.71,99.29 2000.71,1899.29 ccw(c1900.71,1899.29) 1900.71,1999.29 100.71,1999.29 ccw(c100.71,1899.29) 0.71,1899.29
VBAT on 3V3 Layer "VBAT_L02_P020" (solid, pour order 20): 0.71,99.29 ccw(c100.71,99.29) 100.71,-0.71 1900.71,-0.71 ccw(c1900.71,99.29) 2000.71,99.29 2000.71,1899.29 ccw(c1900.71,1899.29) 1900.71,1999.29 100.71,1999.29 ccw(c100.71,1899.29) 0.71,1899.29

## Silkscreen, mask and mechanical layers (free items; w line width, h text height)
Top Overlay:
  lines w5: 30,896.68 270,896.68 ; 150,776.68 150,1016.68 ; 582.6,271.94 582.6,380 ; 707.6,276.94 707.6,385 ; 1157.6,276.94 1157.6,385 ; 1277.6,276.94 1277.6,385 ; 1490,1362.36 1572.64,1362.36 ; 1490,1492.36 1572.64,1492.36 ; 1670,542.36 1764.39,542.36 ; 460,1570 695,1570 695,1770 460,1770 460,1570
  lines w6: 845.8,275 845.8,385.25 ; 1019.5,275 1019.5,385.25 ; 1490,1236 1665,1236 1665,1634 1490,1634 1490,1236 ; 1670,407.36 1926.39,407.36 1926.39,742.36 1670,742.36 1670,407.36
  lines w8: 30,776.68 270,776.68 270,1016.68 30,1016.68 30,776.68 ; 447.89,55 1417.5,55 1417.5,385 447.89,385 447.89,55
  text "MRover 27 / ServoBoard" at 345,1810 h50
  text "SERVO" at 1650,1710 h55 r90
  text "JT / RN" at 595,1650 h30
  text "RW / IL / AZ" at 490,1600 h30
  text "Data" at 1554,1511 h30 r90
  text "FLASH" at 365,1470 h60 r270
  text "5V" at 1558,1397 h40 r90
  text "⏚" at 1565,1270 h120 r90
  text "⏚" at 60,985 h120 r270
  text "LIM" at 295,975 h60 r270
  text "A" at 183,972 h60 r270
  text "⏚" at 60,870 h120 r270
  text "B" at 178,857 h60 r270
  text "in" at 1652,583 h40 r90
  text "5V" at 1742,578 h50 r90
  text "V" at 1640,520 h60 r90
  text "⏚" at 1750,450 h120 r90
  text "⏚" at 750,300 h120
  text "H" at 493,298 h60
  text "L" at 628,298 h60
  text "H" at 1068,298 h60
  text "L" at 1198,298 h60
  text "⏚" at 1315,295 h120
  text "CAN" at 1450,190 h60
Bottom Overlay:
  drawing of 81 lines, arcs and shapes, not listed
  text "Docs" at 850,1875 h60
  text "https://docs.mrover.org/electrical/ehw/boards/servo/" at 1025,1265 h0